# Altium PCB Zybo_Z7_Pcb.PcbDoc (part 3 of 8)
Units mm, origin at the board's own origin, x right, y up, seen from the top; angles counter-clockwise.
Board outline 122 x 88 mm, 8 copper layers (Top Layer, Layer 2, Layer 3, Layer 4, Layer 5, Layer 6, Layer 7, Bottom Layer), stack 1.625 mm thick; 658 components, 558 nets, 2538 pads, 924 vias.
Unrouted connection lines stored in the file: 1229.
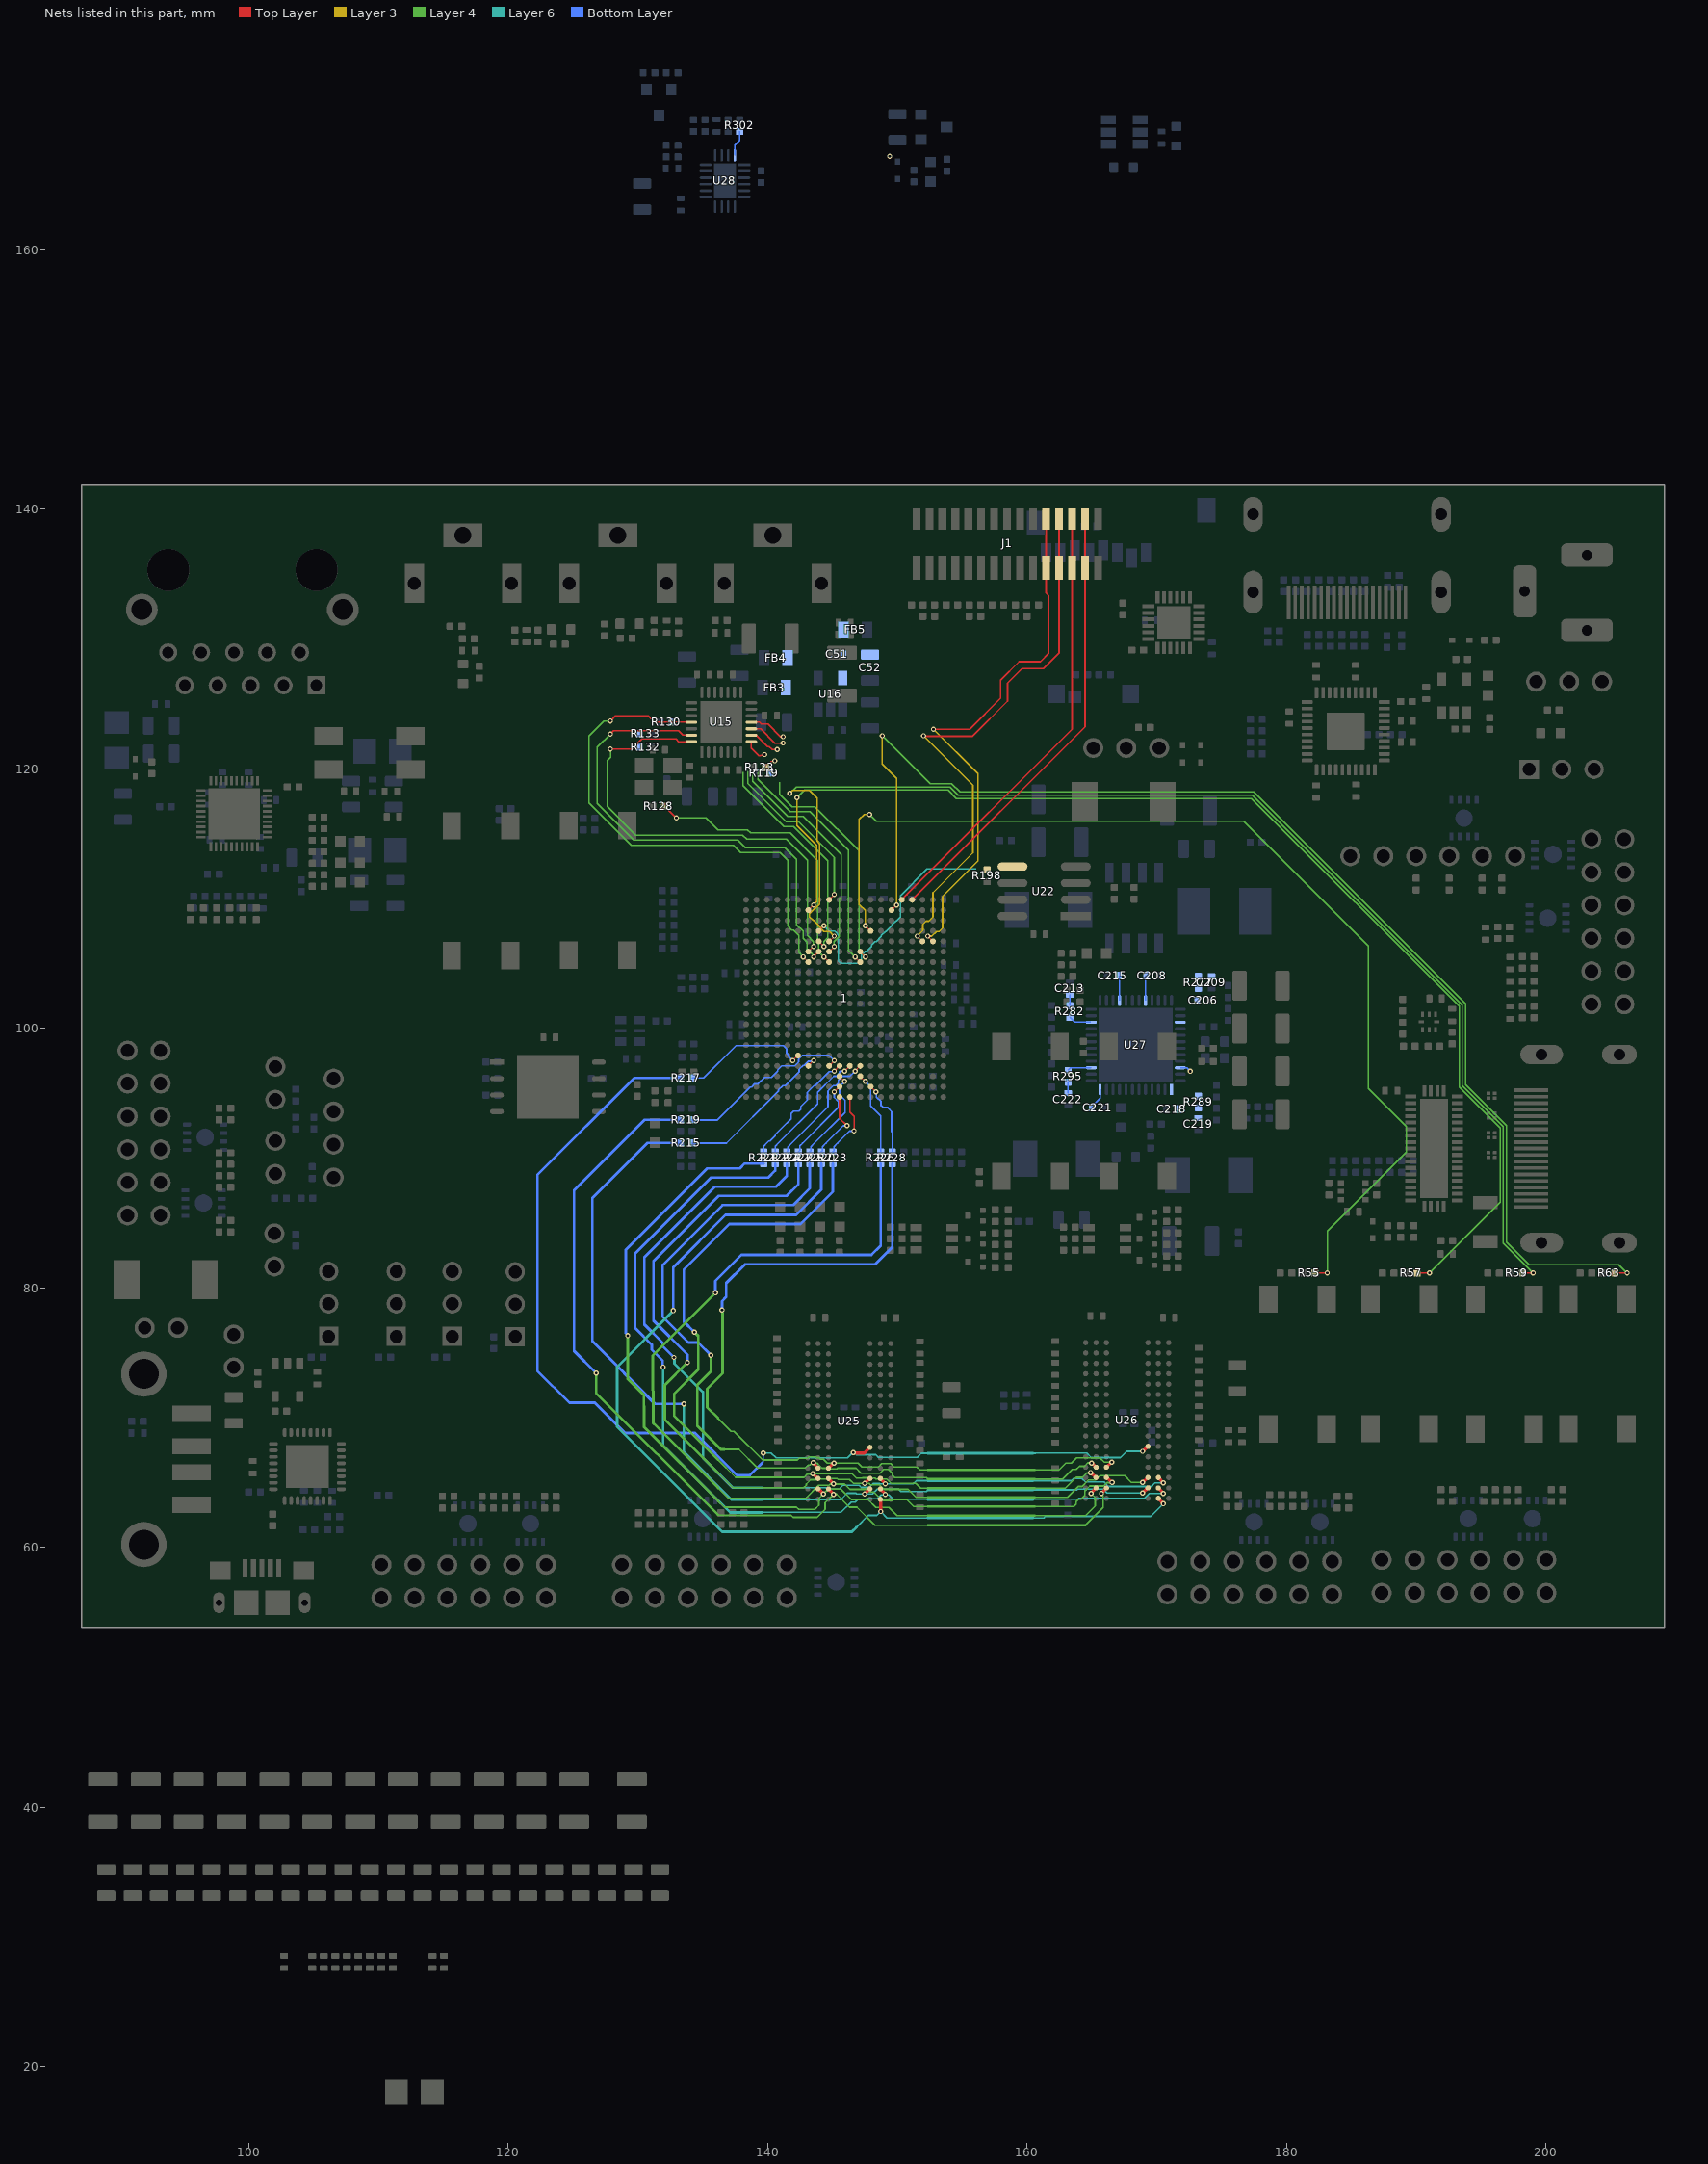
[diagram p9: the nets of this part, all layers, seen from the top]

## Footprints (in the part's own frame and the unit in brackets; to place one, negate y for a bottom-side part, rotate by r counter-clockwise, add the part's x,y. Pads: shape width x height; smd on the part's side, far side on the other; paste and mask are expansions set on the pad) (continued)
MICT-HA-96 [mm] "BGA, 96-Balls, Body 14x9mm, Pitch 0.8mm"
  round 0.4 smd: A1(-3.2,6) A2(-2.4,6) A3(-1.6,6) A7(1.6,6) A8(2.4,6) A9(3.2,6) B1(-3.2,5.2) B2(-2.4,5.2) B3(-1.6,5.2) B7(1.6,5.2) B8(2.4,5.2) B9(3.2,5.2) C1(-3.2,4.4) C2(-2.4,4.4) C3(-1.6,4.4) C7(1.6,4.4) C8(2.4,4.4) C9(3.2,4.4) D1(-3.2,3.6) D2(-2.4,3.6) D3(-1.6,3.6) D7(1.6,3.6) D8(2.4,3.6) D9(3.2,3.6) E1(-3.2,2.8) E2(-2.4,2.8) E3(-1.6,2.8) E7(1.6,2.8) E8(2.4,2.8) E9(3.2,2.8) F1(-3.2,2) F2(-2.4,2) F3(-1.6,2) F7(1.6,2) F8(2.4,2) F9(3.2,2) G1(-3.2,1.2) G2(-2.4,1.2) G3(-1.6,1.2) G7(1.6,1.2) G8(2.4,1.2) G9(3.2,1.2) H1(-3.2,0.4) H2(-2.4,0.4) H3(-1.6,0.4) H7(1.6,0.4) H8(2.4,0.4) H9(3.2,0.4) J1(-3.2,-0.4) J2(-2.4,-0.4) J3(-1.6,-0.4) J7(1.6,-0.4) J8(2.4,-0.4) J9(3.2,-0.4) K1(-3.2,-1.2) K2(-2.4,-1.2) K3(-1.6,-1.2) K7(1.6,-1.2) K8(2.4,-1.2) K9(3.2,-1.2) L1(-3.2,-2) L2(-2.4,-2) L3(-1.6,-2) L7(1.6,-2) L8(2.4,-2) L9(3.2,-2) M1(-3.2,-2.8) M2(-2.4,-2.8) M3(-1.6,-2.8) M7(1.6,-2.8) M8(2.4,-2.8) M9(3.2,-2.8) N1(-3.2,-3.6) N2(-2.4,-3.6) N3(-1.6,-3.6) N7(1.6,-3.6) N8(2.4,-3.6) N9(3.2,-3.6) P1(-3.2,-4.4) P2(-2.4,-4.4) P3(-1.6,-4.4) P7(1.6,-4.4) P8(2.4,-4.4) P9(3.2,-4.4) R1(-3.2,-5.2) R2(-2.4,-5.2) R3(-1.6,-5.2) R7(1.6,-5.2) R8(2.4,-5.2) R9(3.2,-5.2) T1(-3.2,-6) T2(-2.4,-6) T3(-1.6,-6) T7(1.6,-6) T8(2.4,-6) T9(3.2,-6)
  silkscreen extent -5.27,-7 4.5,7, body extent -4.5,-7 4.5,7, height 0.1
MOLX-473521001_V [mm] "SMD, 8-Leads, Body 15.2x14mm, Pitch 1.1mm"
  rect 0.8x1.5 smd: 1(1.94,-3.66) 2(0.84,-3.26) 3(-0.26,-3.66) 4(-1.36,-3.86) 5(-2.46,-3.66) 6(-3.56,-3.86) 7(-4.66,-3.66) 8(-5.76,-3.66)
  rect 1x0.95 smd: 9(-3.56,7.425)
  rect 1.3x1.4 smd: 10(-4.95,7.2) 11(0.75,7.2)
  rect 1.4x1.9 smd: 12(6.6,-6.95) 13(-6.55,-5.95)
  silkscreen extent -7,-7.6 7.78,7.6, body extent -7.05,-7.6 7.05,7.6, height 1.85
ONSC-SOD-523-2-502-01_V [mm] "SOD, 2-Leads, Body 1.2x0.8mm"
  rect 0.48x0.4 smd: 1(-0.66,0) 2(0.66,0)
  silkscreen extent -0.75,-0.4 0.07,0.65, body extent -0.6,-0.4 0.6,0.4, height 0.7
QFN40P500X500X90-41N-D [mm]
  rect 0.7x0.2 smd: 1(-2.55,1.8) 2(-2.55,1.4) 3(-2.55,1) 4(-2.55,0.6) 5(-2.55,0.2) 6(-2.55,-0.2) 7(-2.55,-0.6) 8(-2.55,-1) 9(-2.55,-1.4) 10(-2.55,-1.8) 21(2.55,-1.8) 22(2.55,-1.4) 23(2.55,-1) 24(2.55,-0.6) 25(2.55,-0.2) 26(2.55,0.2) 27(2.55,0.6) 28(2.55,1) 29(2.55,1.4) 30(2.55,1.8)
  rect 0.2x0.7 smd: 11(-1.8,-2.55) 12(-1.4,-2.55) 13(-1,-2.55) 14(-0.6,-2.55) 15(-0.2,-2.55) 16(0.2,-2.55) 17(0.6,-2.55) 18(1,-2.55) 19(1.4,-2.55) 20(1.8,-2.55) 31(1.8,2.55) 32(1.4,2.55) 33(1,2.55) 34(0.6,2.55) 35(0.2,2.55) 36(-0.2,2.55) 37(-0.6,2.55) 38(-1,2.55) 39(-1.4,2.55) 40(-1.8,2.55)
  rect 3.95x3.95 smd: 41(0,0)
  silkscreen extent -3,2.3 -2.8,2.5, body extent -2.55,-2.55 2.55,2.55, height 0.9
QFN50P350X900X80-43N-D [mm]
  rect 0.85x0.3 smd: 1(-1.8,4) 2(-1.8,3.5) 3(-1.8,3) 4(-1.8,2.5) 5(-1.8,2) 6(-1.8,1.5) 7(-1.8,1) 8(-1.8,0.5) 9(-1.8,0) 10(-1.8,-0.5) 11(-1.8,-1) 12(-1.8,-1.5) 13(-1.8,-2) 14(-1.8,-2.5) 15(-1.8,-3) 16(-1.8,-3.5) 17(-1.8,-4) 22(1.8,-4) 23(1.8,-3.5) 24(1.8,-3) 25(1.8,-2.5) 26(1.8,-2) 27(1.8,-1.5) 28(1.8,-1) 29(1.8,-0.5) 30(1.8,0) 31(1.8,0.5) 32(1.8,1) 33(1.8,1.5) 34(1.8,2) 35(1.8,2.5) 36(1.8,3) 37(1.8,3.5) 38(1.8,4)
  rect 0.3x0.85 smd: 18(-0.75,-4.45) 19(-0.25,-4.45) 20(0.25,-4.45) 21(0.75,-4.45) 39(0.75,4.45) 40(0.25,4.45) 41(-0.25,4.45) 42(-0.75,4.45)
  rect 2.15x7.65 smd: 43(0,0)
  silkscreen extent -2.22,4.63 -1.97,4.87, body extent -1.75,-4.5 1.75,4.5, height 0.8
QFN50P400X400X80-25N-D [mm]
  rect 0.9x0.3 smd: 1(-1.95,1.25) 2(-1.95,0.75) 3(-1.95,0.25) 4(-1.95,-0.25) 5(-1.95,-0.75) 6(-1.95,-1.25) 13(1.95,-1.25) 14(1.95,-0.75) 15(1.95,-0.25) 16(1.95,0.25) 17(1.95,0.75) 18(1.95,1.25)
  rect 0.3x0.9 smd: 7(-1.25,-1.95) 8(-0.75,-1.95) 9(-0.25,-1.95) 10(0.25,-1.95) 11(0.75,-1.95) 12(1.25,-1.95) 19(1.25,1.95) 20(0.75,1.95) 21(0.25,1.95) 22(-0.25,1.95) 23(-0.75,1.95) 24(-1.25,1.95)
  rect 2.55x2.55 smd: 25(0,0)
  silkscreen extent -2.52,1.88 -2.28,2.12, body extent -2,-2 2,2, height 0.8
R_0402 [mm] "Chip 0402 resistor"
  rrect25% 0.55x0.55 smd: 1(-0.45,0) 2(0.45,0)
  body extent -0.49,-0.24 0.49,0.24, height 0.35
RHA0040D_V [mm] "QFN, 40-Leads, Body 6x6mm, Pitch 0.5mm, Thermal Pad 2.9x2.9mm"
  rrect36% 0.85x0.28 smd: 1(-2.975,2.25) 2(-2.975,1.75) 3(-2.975,1.25) 4(-2.975,0.75) 5(-2.975,0.25) 6(-2.975,-0.25) 7(-2.975,-0.75) 8(-2.975,-1.25) 9(-2.975,-1.75) 10(-2.975,-2.25) 21(2.975,-2.25) 22(2.975,-1.75) 23(2.975,-1.25) 24(2.975,-0.75) 25(2.975,-0.25) 26(2.975,0.25) 27(2.975,0.75) 28(2.975,1.25) 29(2.975,1.75) 30(2.975,2.25)
  rrect36% 0.28x0.85 smd: 11(-2.25,-2.975) 12(-1.75,-2.975) 13(-1.25,-2.975) 14(-0.75,-2.975) 15(-0.25,-2.975) 16(0.25,-2.975) 17(0.75,-2.975) 18(1.25,-2.975) 19(1.75,-2.975) 20(2.25,-2.975) 31(2.25,2.975) 32(1.75,2.975) 33(1.25,2.975) 34(0.75,2.975) 35(0.25,2.975) 36(-0.25,2.975) 37(-0.75,2.975) 38(-1.25,2.975) 39(-1.75,2.975) 40(-2.25,2.975)
  rrect3% 2.9x2.9 smd: 41(0,0)
  silkscreen extent -3.85,-3.08 3.08,3.08, body extent -3,-3 3,3, height 1
ROHM-SOT723-3_V [mm] "SOT723, 3-Leads, Body 1.2x0.8mm, Pitch 0.8mm"
  rrect30% 0.45x0.4 smd: 1(-0.575,0.4) 2(-0.575,-0.4)
  rrect30% 0.45x0.5 smd: 3(0.575,0)
  body extent -0.53,-0.63 0.53,0.63, height 0.45
SOIC127P600X175-8N [mm]
  rect 1.525x0.65 smd: 1(-2.712,1.905) 2(-2.712,0.635) 3(-2.712,-0.635) 4(-2.712,-1.905) 5(2.712,-1.905) 6(2.712,-0.635) 7(2.712,0.635) 8(2.712,1.905)
  silkscreen extent -3.47,-2.45 1.6,2.58, body extent -3,-2.45 3,2.45, height 1.75
SWIT-PJRAN1X1U01X_V [mm] "Jack, 3-Leads, Body 19.5x10mm"
  rect 3x1.8 hole 1.3 square paste-2539.97: 1(0,0)
  rect 1.5x3 hole 1 square paste-2539.97: 2(-3.75,3.7) 3(3.75,3.7)
  silkscreen extent -5.77,-4 5,6, body extent -5,-13.5 5,6, height 13
TCM06U_DFN65X50X35-4N [mm] "DFN, 4-Leads, Body 0.65x0.50mm, Pitch 0.45mm, IPC Medium Density"
  rrect25% 0.3x0.25 smd: 1(-0.25,0.182) 2(-0.25,-0.183) 3(0.25,-0.183) 4(0.25,0.182)
  body extent -0.38,-0.28 0.35,0.28, height 0.35
WL-SFTW_3528_150352M173303 [mm] "SMT Full-color TOP LED Waterclear, body 3.5x2.8mm"
  rect 0.89x0.55 smd: 1(-1.395,0.85) 2(1.395,0.85) 3(-1.395,0) 4(1.395,0) 5(-1.395,-0.85) 6(1.395,-0.85)
  silkscreen extent -2.47,-1.43 1.63,1.43, body extent -1.75,-1.4 1.75,1.4, height 1.78

## Part data
1: "Integrated Circuit", Manufacturer_Name=AMD, Mouser Part Number=217-XC7Z020-1CLG400C, Datasheet Link=http://www.xilinx.com/support/documentation/data_sheets/ds190-Zynq-7000-Overview.pdf, Height=1.6mm, Manufacturer_Part_Number=XC7Z020-1CLG400C, Mouser Price/Stock=https://www.mouser.co.uk/ProductDetail/AMD-Xilinx/XC7Z020-1CLG400C?qs=rrS6PyfT74eaxuOsP%2FGL4g%3D%3D
C1 C2 C8 C9 C15 C17 C23 C25 C28 C29 C33 C34 C42 C49 C52 C96 C97 C98 C104 C105 C106 C108 C117 C118 C119 C121 C127 C133 C134 C138 C139 C147 C148 C149 C150 C151 C157 C196 C199 C211 C223 C224 C226 C232: library part CMP-001-00086-2, "MLCC 0805"
C3 C4 C5 C6 C7 C11 C12 C13 C14 C16 C18 C19 C20 C21 C24 C26 C27 C30 C32 C35 C37 C38 C40 C43 C45 C46 C47 C48 C50 C51 C53 C54 C55 C56 C57 C58 C59 C60 C61 C62 C63 C64 C65 C66 C67 C68 C69 C70 C71 C72 C73 C74 C75 C78 C79 C80 C81 C82 C83 C84 C85 C86 C87 C88 C89 C90 C91 C92 C99 C100 C101 C102 C103 C109 C110 C112 C113 C114 C115 C116 C122 C123 C125 C126 C129 C130 C131 C135 C136 C137 C141 C142 C143 C144 C145 C152 C153 C154 C156 C158 C159 C160 C161 C162 C163 C164 C165 C166 C167 C168 C169 C170 C171 C172 C173 C174 C175 C176 C177 C178 C179 C180 C181 C182 C183 C184 C185 C186 C187 C188 C189 C190 C191 C192 C193 C194 C195 C197 C198 C206 C208 C209 C213 C214 C215 C218 C219 C221 C222 C227 C229 C231: library part CMP-001-00084-2, "MLCC 0402"
C31 C36 C77 C93 C94 C95 C107 C111 C120 C124 C128 C132 C140 C146 C155 C200 C201 C202 C203 C212 C216 C217 C220: library part CMP-001-00088-1, "1210, X5R:EIA, 100uF, DC6.3V, GRM32ER60J107ME20"
C39 C41 C44 C204 C205 C207 C210 C225 C228 C230: library part CMP-001-00085-2, "MLCC 0603"
C76 C233: library part CMP-04424-000170-1, "47uF 6.3V  ±20% 1.1Ω 2917  SMD Tantalum Capacitor", Capacitance=47uF, Case/Package=2917, ESR (Equivalent Series Resistance)=1.1R, Max Operating Temperature=125°C, Min Operating Temperature=-55°C, Package Quantity=500, Tolerance=20%, Voltage Rating=6.3V, Depth=4.3mm, Dissipation Factor=6%, Features="General Purpose", Height - Seated (Max)=0.122inch, Lead Free="Lead Free", Length=0.287inch, Mount="Surface Mount", Packaging="Tape and Reel", Polarity=Polar, RoHS Compliant=Yes, Series=TAJ, Voltage Rating (DC)=6.3V, Width=0.169inch
D1 D2 D12 D15 D18: library part CMP-1054-00076-1, "Switching Diode, 2-Pin SOD-523, Pb-Free, Tape and Reel", Manufacturer="On Semiconductor", ComponentLink1Description="Manufacturer URL", ComponentLink1URL=http://www.onsemi.com/, ComponentLink2Description=Datasheet, ComponentLink2URL=http://www.onsemi.com/pub_link/Collateral/BAS16XV2T1-D.PDF, ComponentLink3Description="Package Specification", ComponentLink3URL=http://www.onsemi.com/pub_link/Collateral/502-01.PDF, Configuration=Single, DatasheetVersion="Rev. 7", IF Max (A)=0.2, Mounting Technology="Surface Mount", PackageDescription="2-Pin SOD, Body 1.2 x 0.8 mm", PackageReference=SOD-523-2-502-01, PackageVersion="Rev. E, 09/2010", Packing="Tape and Reel", PartNumber=BAS16XV2T1G, RoHS=TRUE, trr Max (ns)=6
D6 D7: library part CMP-03913-162511587-1, "Led, Rgb, 625/520/470Nm, 120Deg Rohs Compliant: Yes", Forward Current=100mA, Forward Voltage=2V, Manufacturer Lifecycle Status=NEW, Max Operating Temperature=105°C, Max Reverse Voltage (DC)=5V, Min Operating Temperature=-40°C, Power Dissipation=65mW, Dominant Wavelength=520nm, Lifecycle Status=New, Luminous Intensity=500mcd, Peak Wavelength=465nm, RoHS=Compliant, Viewing Angle=120°, YEOL="1 = Estimated lifetime > 10 years"
D16: library part CMP-07162-000019-1, "DIODE SCHOTTKY 30V 200MA SOD523F", Capacitance=7pF, Forward Current=200mA, Manufacturer="ON Semiconductor", Manufacturer Part Number=BAT43XV2, Max Junction Temp=+125°C, Max Repetitive Reverse Voltage=30V, Max Surge Forward Current=4A, Package=502-01, Peak Reverse Current=0.5uA, Temperature="to +125°C", Automotive=No, Category=Diode, ComponentLink2Description=Datasheet, ComponentLink2URL=https://www.onsemi.com/pub/Collateral/BAT43XV2-D.PDF, Device Class L1="Discrete Semiconductors", Device Class L2=Diodes, Device Class L3="Schottky Diodes", Digikey Description="DIODE SCHOTTKY 30V 200MA SOD523F", Footprint Url=https://www.onsemi.com/pub/Collateral/502-01.PDF, Height=0.7mm, Lead Free=Yes, Mouser Description="Schottky Diodes & Rectifiers Schottky Barrier Diode", Octopart=https://octopart.com/bat43xv2-on+semiconductor-84324519, Reverse Voltage=30V, RoHS=TRUE, Temperature Range High=+125°C
DS1 DS2 DS3 DS4 DS5 DS6 DS7 DS8 DS9 DS10 DS11: library part CMP-007-00005-2, "Chip LED, Yellow, 5 V, 25mA, -40 to 85 degC, 2-Pin SMD (0603), RoHS, Tape and Reel", Case/Package=0603, Manufacturer="Everlight Electronics", Package Description="2-Pin Surface Mount Device, Body 1.6 x 0.8 mm", Datasheet URL=http://www.fairchip.com/pdf/Everlight/19-217-Y5C-AM1N1VY-3T.pdf, Datasheet Version="Rev. 1.0, 12/2005", Manufacturer URL=http://www.everlight.com/, Mounting Technology=SM, Package Reference=0603, RoHS Compliant=False
F1: library part CMP-16043-000007-1, "PTC RESET FUSE 30V 200MA 1206", Case Code (Imperial)=1206, Case Code (Metric)=3216, Hold Current=200mA, Max Current Rating=10A, Max Operating Temperature=85°C, Max Voltage Rating (DC)=30V, Min Operating Temperature=-40°C, Package Quantity=3000, Power Dissipation=400mW, Trip Current=400mA, Approvals=UL, Case/Package=1206, Contact Plating=Tin, Lead Free="Lead Free", Mount="Surface Mount", Number of Terminals=2, Packaging="Cut Tape", Time to Trip=0.1s
FB1 FB2 FB7 FB8: library part CMP-06046-002432-1, "Chip Ferrite Bead, 1206, 600Ω @ 100MHz, 0.038Ω, 25%, 2.9A", Case Code (Imperial)=1206, Case Code (Metric)=3216, DC Resistance (DCR)=38mR, Max Current Rating=2.9A, Max Operating Temperature=125°C, Min Operating Temperature=-55°C, Case/Package=1206, Mount="Surface Mount", Number of Lines=1, Packaging="Cut Tape"
FB3 FB4 FB5 FB6: library part CMP-2000-05401-2, Case Code (Imperial)=0805, Case Code (Metric)=2012, Current Rating=2A, DC Resistance (DCR)=100mΩ, Manufacturer Lifecycle Status=PRODUCTION, Max Operating Temperature=125°C, Min Operating Temperature=-55°C, Test Frequency=100MHz, Tolerance=25%, Case/Package=0805, Core Material=Ferrite, Height=1.0414mm, Impedance=600Ω, Lead Free="Lead Free", Length=2mm, Lifecycle Status=Production, Max DC Current=2A, Max Length=2.2mm, Max Width=1.45mm, Min Length=1.8mm, Min Width=1.05mm, Mount="Surface Mount", NexarPartId=12090955, Packaging=Digi-Reel®, REACH SVHC="No SVHC", Resistance=100mΩ, RMS Current (Irms)=2A, RoHS=Compliant, Schedule B="8504500000, 8504500000", Series Resistance=100mΩ, Width=1.25mm
IC1: "Integrated Circuit", Manufacturer_Name=Realtek, Height=0.9mm, Manufacturer_Part_Number=RTL8211F-CG
IC2: "Integrated Circuit", Manufacturer_Name="Texas Instruments", Mouser Part Number=595-TXS02612RTWR, Arrow Part Number=TXS02612RTWR, Arrow Price/Stock=https://www.arrow.com/en/products/txs02612rtwr/texas-instruments?utm_currency=USD&region=nac, Datasheet Link=http://www.ti.com/lit/gpn/txs02612, Height=0.8mm, Manufacturer_Part_Number=TXS02612RTWR, Mouser Price/Stock=https://www.mouser.co.uk/ProductDetail/Texas-Instruments/TXS02612RTWR?qs=dqESbKqT1jaNFKC1R4M7hw%3D%3D
IC3: "Integrated Circuit", Manufacturer_Name="Texas Instruments", Mouser Part Number=595-TS3DV642A0RUAR, Arrow Part Number=TS3DV642A0RUAR, Arrow Price/Stock=https://www.arrow.com/en/products/ts3dv642a0ruar/texas-instruments.html?utm_currency=USD&region=nac, Datasheet Link=http://www.ti.com/lit/gpn/ts3dv642, Height=0.8mm, Manufacturer_Part_Number=TS3DV642A0RUAR, Mouser Price/Stock=https://www.mouser.co.uk/ProductDetail/Texas-Instruments/TS3DV642A0RUAR?qs=zjX5mX%252BjEMCTQjtLUY3z%2FA%3D%3D
IC4: "Integrated Circuit", Manufacturer_Name=NXP, Mouser Part Number=771-GTL2002GM125, Datasheet Link=https://componentsearchengine.com/Datasheets/2/GTL2002GM,125.pdf, Height=0.5mm, Manufacturer_Part_Number=GTL2002GM,125, Mouser Price/Stock=https://www.mouser.co.uk/ProductDetail/NXP-Semiconductors/GTL2002GM125?qs=me8TqzrmIYUIuvCVdWJDlA%3D%3D
IC5: "Integrated Circuit", Manufacturer_Name=onsemi, Mouser Part Number=512-FDS9926A, Arrow Part Number=FDS9926A, Arrow Price/Stock=https://www.arrow.com/en/products/fds9926a/on-semiconductor?utm_currency=USD&region=nac, Datasheet Link=https://www.onsemi.com/pub/Collateral/FDS9926A-D.PDF, Height=1.75mm, Manufacturer_Part_Number=FDS9926A, Mouser Price/Stock=https://www.mouser.co.uk/ProductDetail/onsemi-Fairchild/FDS9926A?qs=HK%252BeIG1iaagpgrEVRWCDdA%3D%3D
J1: library part CMP-03368-000001-1, "CONN FPC VERT 15POS 1.00MM SMD", Current Rating=1A, Manufacturer=TE, Package=0, Temperature="-20°C to +85°C", Temperature Range High=+85°C, Temperature Range Low=-20°C, Voltage Rating=125V, Automotive=No, Category=Conn, ComponentLink2Description=Datasheet, ComponentLink2URL=https://www.te.com/commerce/DocumentDelivery/DDEController?Action=showdoc&DocId=Customer+Drawing%7F1734248%7FE1%7Fpdf%7FEnglish%7FENG_CD_1734248_E1__.pdf%7F1-1734248-5, Conn Gender=Female, Conn Orientation=Vertical, Contact Material=Gold,Nickel, Device Class L1=Connectors, Device Class L2="FFC / FPC", Device Class L3=unset, Digikey Description="CONN FPC VERT 15POS 1.00MM SMD", Height=8mm, Is Female=yes, Lead Free=Yes, Manufacturer Part Number=1-1734248-5, Mounting Type="Surface Mount", Mouser Description="FFC & FPC Connectors 15P 1.0 FPC, Zip V/T SMT", Number Of Contacts=15, Octopart=https://octopart.com/1-1734248-5-te+connectivity-40620898, Pitch=1mm, RoHS=TRUE
J2: library part CMP-218039-000001-2, "Conn RJ-45 F 8 POS 2.54mm Solder RA Thru-Hole 10 Terminal 1 Port", Manufacturer=HALO, Package=0, Temperature="0°C to +70°C", Temperature Range High=+70°C, Temperature Range Low=0°C, Automotive=No, Category=Conn, ComponentLink2Description=Datasheet, ComponentLink2URL=https://www.haloelectronics.com/pdf/fastjack-gigabit.pdf, Conn Gender=Female, Conn Orientation=Horizontal, Contact Material=Gold, Device Class L1=Connectors, Device Class L2="Modular / Ethernet Connectors", Device Class L3=unset, Height=0.624inch, Is Female=yes, Lead Free=Yes, Manufacturer Part Number=HFJ11-1G01ERL, Mouser Description="Conn RJ-45 F 8 POS 2.54mm Solder RA Thru-Hole 10 Terminal 1 Port", Number Of Contacts=8, Octopart=https://octopart.com/hfj11-1g01erl-halo-4052130, Pitch=1.27mm, RoHS=TRUE, Shielding=true
J3 J4 J5: library part CMP-1772-00003-1, "Female Phono Jack, 3 Position, Height 13 mm, Tail Length 4 mm, RoHS, Bulk", Capacitance="100 nF", Case\Package=Radial, Max Operating Temperature="125 degC", Min Operating Temperature="-55 degC", Package Quantity=500, Tolerance=10%, Type (Capacitors)=X7R, Voltage Rating="50 V", ComponentLink1Description="Manufacturer URL", ComponentLink1URL=http://www.switchcraft.com/, ComponentLink2Description=Datasheet, ComponentLink2URL=http://www.conxall.com/Drawings/pjran1x1u__x_series_cd.pdf, DatasheetVersion="Rev. A, 01/2006", Height="3.18 mm", Lead Pitch="2.54 mm", Length="6.6 mm", Mount="Through Hole", PackageDescription="Female Phono Jack, 3 Position, Height 13 mm, Tail Length 4 mm", PackageReference=PJRAN1X1U01X, Packaging=Bulk, Pins=2, Radiation Hardening=No, REACH SVHC="No SVHC", RoHSCompliant=true, Voltage Rating (DC)="50 V", Width="5.08 mm"
J6 J7: library part CMP-1502-00169-4, "HDMI Receptacle Connector 19 Position Surface Mount, Right Angle Through Hole", Color=Black, Contact Resistance=30mΩ, Current Rating=500mA, Insulation Resistance=10MΩ, Max Operating Temperature=85°C, Min Operating Temperature=-25°C, Voltage Rating=40V, Body Material=Plastic, Connector Type=HDMI, Contact Material=Gold, Features=Shielded, Gender=Receptacle, Height=6.28mm, Length=12.15mm, Mount="Horizontal, Surface Mount", Number Of Contacts=19, Number of Pins=19, Number of Positions=19, Orientation=Horizontal, Packaging="Tape and Reel", REACH SVHC=Unknown, RoHS=Compliant, Termination=SMD/SMT, Width=15mm
J8: library part CMP-2000-05119-1, "Micro USB B Type Receptacle, -55 to 85 degC, 5-Pin SMD, RoHS, Tape and Reel", Color=Black, Current Rating=1.8A, Flammability Rating=UL94V-0, Insulation Resistance=1000MOhms, Manufacturer=FCI, Operating Temperature Range=-55Cto+85C, Brand=FCI, Connector Type=MicroUSBTypeBreceptacle, Contact Material=CopperAlloy, Contact Plating=Gold, Datasheet URL=http://datasheet.octopart.com/10118193-0001LF-FCI-datasheet-55953155.pdf, Datasheet Version="Rev. C, 05/2015", Factory Pack Quantity=1200, Gender=Female, Manufacturer URL=http://www.fci.com/, Mounting Angle=Right, Number Of Contacts=5Contact, Packaging=Reel, Product=MicroUSBTypeBConnectors, Product Category=USBConnectors, RoHS=Details, Standard=USB2.0, Termination Style=SMD/SMT
J9: library part CMP-03360-000008-1, "CONN RCPT USB2.0 TYPEA 4P SMD RA", Current Rating=1A, Manufacturer="TE Connectivity", Temperature="-55°C to +85°C", Temperature Range High=+85°C, Temperature Range Low=-55°C, Voltage Rating=30V, Automotive=No, Category=Conn, ComponentLink2Description=Datasheet, ComponentLink2URL=https://www.te.com/usa-en/product-292303-7.html?te_bu=Cor&te_type=other&te_campaign=oct_glo_cor-oct-global-oth-prtnr-fy19-oct-octo-buy-bom_sma-298_2&elqCampaignId=35216, Conn Orientation="Right Angle", Contact Material=Gold,Nickel, Device Class L1=Connectors, Device Class L2="USB Connectors", Device Class L3=unset, Digikey Description="CONN RCPT USB2.0 TYPEA 4P SMD RA", Is Female=yes, Lead Free=Yes, Manufacturer Part Number=292303-7, Mouser Description="USB Connectors USB A R/A Recpt Assy SMT", Number Of Contacts=4, Octopart=https://octopart.com/292303-7-te+connectivity-42840369, Package=292303-7, RoHS=TRUE, Shielding=true, Usb Standard="USB 2.0"
J10: library part CMP-1502-00190-4, "DC Power Jack Connector WR-DC, Male, Right Angled, THT, 5 A, 24 V", Color=Black, Current Rating=5A, Flammability Rating="UL94 V-0", Insulation Resistance=100MΩ, Max Operating Temperature=85°C, Min Operating Temperature=-40°C, Operating Supply Voltage=24V, Voltage Rating=30V, Connector Type=Power, Contact Gender=Female, Contact Material="Gold, Tin", Contact Plating=Tin, Gender=Male, Height=11mm, Housing Material=Polyamide, Mount="Through Hole", Number Of Contacts=3, Packaging=Bulk, REACH SVHC=Unknown, RoHS=Compliant, Shielding=Unshielded, Termination="Through Hole"
L1 L2 L3 L4: library part CMP-006-00021-1, "Common mode filters Ultra high-speed differential signal line TCM-U series"
L6: library part ETQ-P3M3R3YFP, "Inductor", Manufacturer_Name=Panasonic, Mouser Part Number=667-ETQ-P3M3R3YFP, Arrow Part Number=ETQ-P3M3R3YFP, Arrow Price/Stock=https://www.arrow.com/en/products/etq-p3m3r3yfp/panasonic.html?utm_currency=USD&region=nac, Datasheet Link=https://industrial.panasonic.com/cdbs/www-data/pdf/AGL0000/AGL0000C59.pdf, Height=4mm, Manufacturer_Part_Number=ETQ-P3M3R3YFP, Mouser Price/Stock=https://www.mouser.co.uk/ProductDetail/Panasonic/ETQ-P3M3R3YFP?qs=sL7MMaRBAPWa%252BM34GljCkQ%3D%3D
L7 L8 L9: library part CMP-02424-000709-1, "Fixed Inductors Commercial High Saturation Series 1.5uH 7.2A 20.7mΩ 20%", Case/Package=2020, Current Rating=7.2A, DC Resistance (DCR)=20.7mR, Inductance=1.5uH, Inductance Tolerance=20%, Max DC Current=11A, Max Operating Temperature=125°C, Min Operating Temperature=-55°C, Package Quantity=2000, Self Resonant Frequency=5MHz, Test Frequency=100kHz, Core Material=Metal, Depth=5.43mm, Height=3mm, Height - Seated (Max)=0.118inch, Lead Free="Lead Free", Length=5.49mm, Military Standard=Not, Mount="Surface Mount", Packaging="Tape and Reel", Radiation Hardening=No, RMS Current (Irms)=7.2A, RoHS Compliant=Yes, Saturation Current=11A, Series=IHLP-2020CZ-01, Shielding=Shielded, Termination=SMD/SMT, Tolerance=20%, Width=5.18mm
P1 P2 P3 P4 P5 P6: library part CMP-002-00077-1, "Male Header, Pitch 2.54 mm, 2x6 Position, Height 8.636 mm, Tail Length 3.05 mm, -55 to 105 degC, RoHS, Bulk", Case/Package=2340-6111TG, Colour=Black, Current Rating=3A, Manufacturer=3M, Max Operating Temperature=105°C, Min Operating Temperature=-55°C, Package Description="Male Header, Pitch 2.54 mm, 1 x 40 Position, Height 8.636 mm, Tail Length 3.05 mm", Package Quantity=200, Connector Type=Header, Contact Finish=Gold, Contact Material=Copper, Contact Plating=Gold, Datasheet URL=https://datasheet.ciiva.com/5161/ts0766-242217-5161112.pdf, Datasheet Version=Aug-08, Gender=Male, Lead Pitch=0.1inch, Manufacturer URL=http://www.3m.com/, Max Current Rating=3A, Mounting Technology=TH, Package Reference=2340-6111TG, Packaging=Bulk, Pins=40, RoHS Compliant=True, Rows=1
P7 P8 P11 P13 P14: library part CMP-002-00078-1, "Male Header, Pitch 2.54 mm, 2x 1 Position, Height 8.636 mm, Tail Length 3.05 mm, -55 to 105 degC, RoHS, Bulk", Case/Package=2340-6111TG, Colour=Black, Current Rating=3A, Manufacturer=3M, Max Operating Temperature=105°C, Min Operating Temperature=-55°C, Package Description="Male Header, Pitch 2.54 mm, 1 x 40 Position, Height 8.636 mm, Tail Length 3.05 mm", Package Quantity=200, Connector Type=Header, Contact Finish=Gold, Contact Material=Copper, Contact Plating=Gold, Datasheet URL=https://datasheet.ciiva.com/5161/ts0766-242217-5161112.pdf, Datasheet Version=Aug-08, Gender=Male, Lead Pitch=0.1inch, Manufacturer URL=http://www.3m.com/, Max Current Rating=3A, Mounting Technology=TH, Package Reference=2340-6111TG, Packaging=Bulk, Pins=40, RoHS Compliant=True, Rows=1
P9: library part CMP-002-00079-1, "Male Header, Pitch 2.54 mm, 1x6 Position, Height 8.636 mm, Tail Length 3.05 mm, -55 to 105 degC, RoHS, Bulk", Case/Package=2340-6111TG, Colour=Black, Current Rating=3A, Manufacturer=3M, Max Operating Temperature=105°C, Min Operating Temperature=-55°C, Package Description="Male Header, Pitch 2.54 mm, 1 x 40 Position, Height 8.636 mm, Tail Length 3.05 mm", Package Quantity=200, Connector Type=Header, Contact Finish=Gold, Contact Material=Copper, Contact Plating=Gold, Datasheet URL=https://datasheet.ciiva.com/5161/ts0766-242217-5161112.pdf, Datasheet Version=Aug-08, Gender=Male, Lead Pitch=0.1inch, Manufacturer URL=http://www.3m.com/, Max Current Rating=3A, Mounting Technology=TH, Package Reference=2340-6111TG, Packaging=Bulk, Pins=40, RoHS Compliant=True, Rows=1
P10 P15: library part CMP-002-00080-1, "Male Header, Pitch 2.54 mm, 1x3 Position, Height 8.636 mm, Tail Length 3.05 mm, -55 to 105 degC, RoHS, Bulk", Case/Package=2340-6111TG, Colour=Black, Current Rating=3A, Manufacturer=3M, Max Operating Temperature=105°C, Min Operating Temperature=-55°C, Package Description="Male Header, Pitch 2.54 mm, 1 x 40 Position, Height 8.636 mm, Tail Length 3.05 mm", Package Quantity=200, Connector Type=Header, Contact Finish=Gold, Contact Material=Copper, Contact Plating=Gold, Datasheet URL=https://datasheet.ciiva.com/5161/ts0766-242217-5161112.pdf, Datasheet Version=Aug-08, Gender=Male, Lead Pitch=0.1inch, Manufacturer URL=http://www.3m.com/, Max Current Rating=3A, Mounting Technology=TH, Package Reference=2340-6111TG, Packaging=Bulk, Pins=40, RoHS Compliant=True, Rows=1
P12: library part CMP-002-00081-1, "Male Header, Pitch 2.54 mm, 1x4 Position, Height 8.636 mm, Tail Length 3.05 mm, -55 to 105 degC, RoHS, Bulk", Case/Package=2340-6111TG, Colour=Black, Current Rating=3A, Manufacturer=3M, Max Operating Temperature=105°C, Min Operating Temperature=-55°C, Package Description="Male Header, Pitch 2.54 mm, 1 x 40 Position, Height 8.636 mm, Tail Length 3.05 mm", Package Quantity=200, Connector Type=Header, Contact Finish=Gold, Contact Material=Copper, Contact Plating=Gold, Datasheet URL=https://datasheet.ciiva.com/5161/ts0766-242217-5161112.pdf, Datasheet Version=Aug-08, Gender=Male, Lead Pitch=0.1inch, Manufacturer URL=http://www.3m.com/, Max Current Rating=3A, Mounting Technology=TH, Package Reference=2340-6111TG, Packaging=Bulk, Pins=40, RoHS Compliant=True, Rows=1
Q1 Q2 Q3 Q4 Q5 Q6: library part CMP-013-00028-2, "NPN General Purpose Transistor, 3-Pin SOT-723, Pb-Free, Tape and Reel", Case/Package=SOT-723, ComponentLink1Description="Manufacturer URL", ComponentLink1URL=http://www.onsemi.com/, ComponentLink2Description=Datasheet, ComponentLink2URL=http://www.onsemi.cn/pub_link/Collateral/MMBT2222AM3-D.PDF, ComponentLink3Description="Package Specification", ComponentLink3URL=http://www.onsemi.com/pub_link/Collateral/631AA.PDF, Mounting Technology=SMT, Pins=3, RoHS Compliant=TRUE
Q7 Q8: library part CMP-2000-04935-2, "MOSFET N-CH 25V 220MA SOT-23", Continuous Drain Current=0.22A, Drain To Source Breakdown Voltage=25V, Drain To Source Resistance=3.1Ω, Gate To Source Voltage=8V, Input Capacitace At Vds="9.5pF @ 10V", Manufacturer="ON Semiconductor", Max Forward Diode Voltage=1.2V, Max Junction Temp=+150°C, Package=318-08, Power Dissipation=0.35W, Temperature="-55°C to +150°C", Temperature Range Low=-55°C, Typ Forward Diode Voltage=0.8V, Automotive=No, Category=Trans, ComponentLink2Description=Datasheet, ComponentLink2URL=https://www.onsemi.com/pub/Collateral/FDV301N-D.PDF, Depletion Mode=False, Device Class L1="Discrete Semiconductors", Device Class L2=Transistors, Device Class L3=MOSFETs, Digikey Description="MOSFET N-CH 25V 220MA SOT-23", Drain To Source Voltage=25V, Footprint Url=https://www.onsemi.com/pub/Collateral/318-08.PDF, Gate Charge At Vgs="0.49nC @ 4.5V", Height=1.11mm, Ipc Land Pattern Name=SOT95P240X100-3, Lead Free=Yes, Manufacturer Part Number=FDV301N, Mouser Description="MOSFET N-Ch Digital", Number Of Channels=1, Number Of N Channels=1, Octopart=https://octopart.com/fdv301n-on+semiconductor-84326713, RoHS=TRUE, Rthja Max=357°C/W, Standoff Height=0.01mm, Temperature Range High=+150°C, Threshold Vgs Max=1.06V, Threshold Vgs Min=0.7V, Transconductance=0.2S, Turn Off Delay Time=3.5ns, Turn On Delay Time=3.2ns
R1 R2 R3 R4 R5 R6 R7 R8 R9 R10 R11 R12 R13 R14 R15 R16 R17 R18 R19 R20 R21 R22 R23 R24 R25 R26 R27 R28 R29 R30 R31 R32 R33 R34 R35 R36 R37 R38 R39 R40 R41 R42 R43 R44 R45 R46 R47 R48 R49 R50 R51 R52 R53 R54 R55 R56 R57 R58 R59 R60 R61 R62 R63 R64 R65 R66 R67 R68 R69 R70 R71 R72 R73 R74 R75 R76 R77 R78 R79 R80 R81 R82 R83 R84 R85 R86 R87 R88 R89 R90 R91 R93 R94 R95 R96 R97 R98 R99 R100 R101 R102 R103 R104 R105 R106 R107 R108 R109 R110 R111 R112 R113 R114 R115 R116 R117 R118 R119 R120 R121 R122 R123 R124 R125 R126 R127 R128 R129 R130 R131 R132 R133 R134 R135 R136 R137 R138 R139 R140 R141 R142 R143 R144 R145 R146 R147 R148 R149 R150 R151 R152 R153 R154 R155 R156 R157 R158 R159 R160 R161 R162 R163 R164 R165 R166 R167 R168 R169 R170 R171 R172 R173 R174 R175 R176 R177 R178 R179 R180 R181 R182 R183 R184 R185 R186 R187 R188 R189 R190 R191 R192 R193 R194 R195 R196 R197 R198 R199 R200 R201 R202 R203 R204 R205 R206 R207 R208 R209 R210 R211 R212 R213 R214 R215 R216 R217 R218 R219 R220 R221 R222 R223 R224 R225 R226 R227 R228 R229 R230 R231 R232 R233 R234 R235 R236 R237 R238 R239 R240 R241 R242 R243 R244 R245 R246 R247 R248 R249 R250 R251 R252 R253 R254 R255 R256 R257 R258 R259 R260 R261 R262 R263 R264 R265 R266 R267 R268 R269 R270 R271 R272 R273 R274 R275 R276 R277 R278 R279 R280 R281 R282 R283 R284 R285 R286 R287 R288 R289 R290 R291 R292 R293 R294 R295 R296 R297 R298 R299 R300 R301 R302 R303 R304 R305 R306 R307 R308 R309: library part CMP-009-00178-3, "Chip 0402 resistor"
SD1: library part CMP-2000-05848-1, "MicroSD(TM), Pitch 1.1 mm, 8 Position, Height 1.88 mm, -20 to 85 degC, RoHS, Tape and Reel", Manufacturer=Molex, Package Description="MicroSD(TM), Pitch 1.1 mm, 8 Position, Height 1.88 mm", Datasheet URL=http://www.molex.com/pdm_docs/sd/473521001_sd.pdf, Datasheet Version="Rev. G, 01/2012", Manufacturer URL=http://www.molex.com/, Mounting Technology=SurfaceMount, Package Reference=473521001
SW1 SW2 SW4 SW5 SW7 SW9 SW11 SW12: library part CMP-00030-00001-1, "Switch Tactile N.O. SPST Round Button Gull Wing 0.05A 12VDC >100000Cycles 1.6N SMD T/R", Case/Package=SMD/SMT, Max Operating Temperature=70°C, Min Operating Temperature=-20°C, Mounting Technology="Surface Mount"
SW3 SW6 SW8 SW10 SW13: library part CMP-011-00006-2, "Slide Switch, SPDT, 500 V, -20 to 70 degC, 3-Pin THD, RoHS, Bulk", Contact Current Rating=200mA, Manufacturer=E-Switch, Max Operating Temperature=70°C, Min Operating Temperature=-20°C, Operating Force=250gf, Package Description="3-Pin Through Hole Device, Body 11.6 x 4 mm, Pitch 2.5 mm", Package Quantity=1000, Voltage Rating (AC)=30V, Case/Package=EG1218, Contact Finish=Silver, Contact Material=Copper, Contact Plating=Silver, Current Rating=200mA, Datasheet URL=https://www.e-switch.com/system/asset/product_line/data_sheet/119/EG.pdf, Datasheet Version=Oct-15, Manufacturer URL=http://www.e-switch.ch/en/, Mounting Technology=TH, Package Reference=EG1218, Packaging=Bulk, Pins=3, RoHS Compliant=True, Throw Configuration=SPDT, Voltage Rating (DC)=30V
U1 U2 U3 U4 U5 U6 U7 U8 U9 U10 U11 U12 U23: library part CMP-031-00006-4, "7-V bidirectional flat-clamp surge protection device 8-SON -40 to 125", Max Operating Temperature=125°C, Min Operating Temperature=-40°C, Pins=8
U15: library part CMP-020-00026-1, "Tape & Reel (TR) EAR99 Active Matte Tin (Sn) codec 90dB 1.5V 5mm 96ksps", Case/Package="LFCSP EP", Max Operating Temperature=85°C, Max Supply Voltage=3.6V, Min Operating Temperature=-40°C, Min Supply Voltage=1.5V, Interface=SPI, Mounting Technology="Surface Mount", Pins=28
U16: library part CMP-0786-00394-1, "Ultralow Noise, 150 mA CMOS Linear Regulator, 2.2 to 5.5 V Vin, 3.3 V Vout, Industrial, 5-pin SOT23 (UJ-5), Reel", Manufacturer="Analog Devices", Preset Vout Values (V)=3.3, Supply Current IGND @ Small Load=10uA, Code_JEDEC=MO-193-AB, ComponentLink1Description="Manufacturer URL", ComponentLink1URL=http://www.analog.com/en/index.html, ComponentLink2Description=Datasheet, ComponentLink2URL=http://www.analog.com/static/imported-files/data_sheets/ADP150.pdf, ComponentLink3Description="Package Specification", ComponentLink3URL=http:/www.analog.com/static/imported-files/packages/PKG_PDF/TSOT(UJ)/UJ_5.pdf, ComponentLink4Description="URL Link1", ComponentLink4URL="Product URL:http://www.analog.com/en/ADP150/productSearch.html", DatasheetVersion="Rev. A", Iout max=150mA, Mounting Technology="Surface Mount", PackageDescription="5-Pin Thin Small Outline Transistor Package, Body 2.9 x 1.6 mm, Pitch 0.95 mm", PackageReference=UJ-5, PackageVersion="100708-A, 10/2008", Packing=Reel, PartNumber=ADP150AUJZ-3.3-R7, Vin (max) (V)=5.5, Vin (min) (V)=2.2
U17: library part CMP-2000-06822-2, "IC BUF NON-INVERT 5.5V SC70-6", Case/Package=SC, High Level Output Current=32mA, Max Operating Temperature=85°C, Max Power Dissipation=180mW, Max Supply Current=24mA, Max Supply Voltage=5.5V, Min Operating Temperature=-40°C, Min Supply Voltage=1.65V, Package Quantity=1, Quiescent Current=1uA, Height=1mm, Lead Free="Lead Free", Length=2mm, Logic Function=Buffer, Low Level Output Current=32mA, Mount="Surface Mount", Number of Bits=2, Number of Bits per Element=1, Number Of Channels=2, Number of Circuits=2, Number of Elements=2, Number of Input Lines=2, Number of Inputs=2, Number of Output Lines=2, Number of Outputs=2, Number of Pins=6, Packaging="Tape and Reel", Polarity=Non-Inverting, Propagation Delay=12.6ns, Radiation Hardening=No, REACH SVHC="No SVHC", Termination=SMD/SMT, Turn-On Delay Time=11.5ns, Weight=0.028g, Width=1.25mm
U18: library part CMP-2000-06816-1, "TinyLogic UHS Buffer with Three-State Output, 1.65 to 5.5 V, -40 to 85 degC, 5-Pin SOT23, RoHS, Tape and Reel", Manufacturer="Fairchild Semiconductor", Max Processing Temp=260, Maximum High Level Output Current=-32mA, Maximum Low Level Output Current=32mA, Maximum Operating Supply Voltage=5.5V, Maximum Quiescent Current=2uA, Minimum Operating Supply Voltage=1.65V, Operating Temperature=-40to85C, Package Description="5-Pin Small Outline Transistor, Body 2.9 x 1.6 mm, Pitch 0.95 mm", Package Reference=SOT23-5, Package Version=08/2015, Tolerant I/Os=5V, Typical Operating Supply Voltage=1.8, Bus Hold=No, Datasheet URL=https://www.fairchildsemi.com/datasheets/NC/NC7SZ125.pdf, Datasheet Version="Rev. 1.0.5, 01/2014", Fabrication Technology=CMOS, Input Signal Type=Single-Ended, Lead Finish=MatteTin, Logic Function=Buffer/LineDriver, Manufacturer URL=https://www.fairchildsemi.com/, Maximum Propagation Delay Time @ Maximum CL=5.7@3.3V, Mounting=SurfaceMount, Mounting Technology=SurfaceMount, Number of Channels per Chip=1, Number of Elements per Chip=1, Number of Inputs per Chip=1, Number of Output Enables per Chip=1Low, Number of Outputs per Chip=1, Output Type=3-State, Package URL=https://www.fairchildsemi.com/package-drawings/MA/MA05B.pdf, Polarity=Non-Inverting, Propagation Delay Test Condition=50pF
U19: library part CMP-020-00027-1, "2.25-Gbps HDMI 1.3a TMDS redriver 40-VQFN 0 to 70", Case/Package=VQFN, Max Operating Temperature=70°C, Max Supply Voltage=3.6V, Min Operating Temperature=0°C, Min Supply Voltage=3V, Pins=40
U20: library part CMP-020-00028-1, "Microchip USB3320C-EZK; USB Transceiver; USB 2.0 at 480Mbit/s; 32-Pin QFN", Frequency=60MHz, Max Operating Temperature=85°C, Max Supply Voltage=2V, Min Operating Temperature=-40°C, Min Supply Voltage=1.6V, Mounting Technology="Surface Mount", Pins=32
U21: library part CMP-2000-07277-1, "Current-Limited, Power-Distribution Switch, 2.7 to 5.5 V, -40 to 85 degC, 5-Pin SOT-23 (DBV), Green (RoHS & no Sb/Br), Tape and Reel", Current Limit=1A, Manufacturer=TexasInstruments, Maximum Operating Temperature=+85C, Minimum Operating Temperature=-40C, On Resistance - Max=70mOhms, Operating Supply Voltage=2.7Vto5.5V, Output Current=500mA, Package / Case=SOT-23-5, Package Description="5-Pin Small Outline Transistor, Body 2.9 x 1.6 mm, Pitch 0.95 mm", Package Reference=DBV5, Package Version="4073253-4/N, 12/2014", Supply Voltage - Max=5.5V, Supply Voltage - Min=2.7V, Brand=TexasInstruments, Datasheet URL=http://www.ti.com/general/docs/lit/getliterature.tsp?genericPartNumber=TPS2051B&fileType=pdf, Datasheet Version="Rev. L, 06/2011", Development Kit=TPS2051BEVM, Factory Pack Quantity=3000, Manufacturer URL=http://www.ti.com/, Mounting Style=SMD/SMT, Mounting Technology=SurfaceMount, Number of Outputs=1Output, Package URL=http://www.ti.com/lit/ml/mpds018l/mpds018l.pdf, Packaging=Reel, Product=USBCurrentLimitedPowerSwitches, Product Category=PowerSwitchICs-PowerDistribution, RoHS=Details, Series=TPS2051B, Type=HighSide
U22: library part CMP-06313-000167-1, "IC AUTHENTICATION CHIP 8SOIC", Case/Package=SOIC, Max Frequency=1MHz, Max Operating Temperature=85°C, Max Supply Voltage=5.5V, Min Operating Temperature=-40°C, Min Supply Voltage=2V, Output Current=4mA, Output Voltage=400mV, Package Quantity=1, Access Time=550ns, Contact Plating=Gold, Density=4.5Kb, Interface=Serial, Lead Free="Lead Free", Mount="Surface Mount", Number of Input Lines=1, Number of Output Lines=1, Number of Pins=8, Packaging="Cut Tape", RoHS Compliant=Yes, Series=CryptoAuthentication™, Weight=0.019048oz
U24: library part CMP-00196-112300131-1, "S25FL128SAGNFM003 NOR Flash 128Mbit 32M X 4Bit/64M X 2Bit/128M X 1Bit Serial-SPI 8-Pin WSON T/R", Ambient Temperature Range High=125°C, Frequency=133MHz, Max Supply Voltage=3.6V, Min Operating Temperature=-40°C, Min Supply Voltage=1.65V, Access Time=8ns, Height=800µm, Interface=SPI, Max Operating Temperature=125°C, Memory Size=16MB, Memory Type="FLASH, NOR", NexarPartId=112300131
U25 U26: library part CMP-019-00061-1, "DDR3L Dram, 256MX16, Cmos, PBGA96", Case/Package=TFBGA, Max Supply Voltage=1.45V, Min Supply Voltage=1.283V
U27: library part CMP-019-00062-1, "5-Channel Integrated Power Solution with Quad Buck Regulators and 200 mA LDO Regulator", Case/Package="LFCSP EP", Max Operating Temperature=125°C, Max Supply Voltage=15V, Min Operating Temperature=-40°C, Min Supply Voltage=4.5V, Nominal Supply Current=4.8mA, Output Current=200mA, Output Voltage=3.305V, Mounting Technology="Surface Mount", Pins=48
U28: library part CMP-019-00063-1, "2.7-V to 18-V, 42mΩ, 0.6-5.2A eFuse with reverse current blocking and DevSleep support 20-WQFN -40 to 85", Max Operating Temperature=85°C, Max Supply Voltage=18V, Min Operating Temperature=-40°C, Min Supply Voltage=2.7V, Nominal Supply Current=2.02mA, Output Current=5.3A, Mounting Technology="Surface Mount", Pins=20
U29: library part CMP-0784-00537-1, "Precision, Micropower LDO Voltage Reference in TSOT, 1.25 V Output, 2.7 to 18 V Supply, Industrial, 6-pin SOT23 (UJ-6), Reel", Manufacturer="Analog Devices", Operating Temp Range="-40 to 125 degC", Code_JEDEC=MO-193-AA, ComponentLink1Description="Manufacturer URL", ComponentLink1URL=http://www.analog.com/en/index.html, ComponentLink2Description=Datasheet, ComponentLink2URL=http://www.analog.com/static/imported-files/data_sheets/ADR121_125_127.pdf, ComponentLink3Description="Package Specification", ComponentLink3URL=http://www.analog.com/static/imported-files/packages/PKG_PDF/TSOT(UJ)/UJ_6.pdf, ComponentLink4Description="URL Link1", ComponentLink4URL="Product URL:http://www.analog.com/en/special-linear-functions/voltage-references/adr127/products/product.html", DatasheetVersion="Rev. B", Max V Supply (V)=18, Min V Supply (V)=2.7, Mounting Technology="Surface Mount", PackageDescription="6-Pin Thin Small Outline Transistor Package, Body 2.9 x 1.6 mm, Pitch 0.95 mm", PackageReference=UJ-6, PackageVersion=Dec-04, Packing=Reel, PartNumber=ADR127BUJZ-REEL7, Ref Out TC (ppm/C)=3, Vout=1.25V
Y1: library part ABMM-25.000MHZ-B2-T, "Crystal or Oscillator", Manufacturer_Name=ABRACON, Mouser Part Number=815-ABMM-25-B2-T, Arrow Part Number=ABMM-25.000MHZ-B2-T, Arrow Price/Stock=https://www.arrow.com/en/products/abmm-25.000mhz-b2-t/abracon?utm_currency=USD&region=nac, Datasheet Link=https://abracon.com/Resonators/ABMM.pdf, Height=1.2mm, Manufacturer_Part_Number=ABMM-25.000MHZ-B2-T, Mouser Price/Stock=https://www.mouser.co.uk/ProductDetail/ABRACON/ABMM-25.000MHZ-B2-T?qs=aMAwYrhw3fjtGmDmGUYkhw%3D%3D
Y2: library part CMP-27762-015475-1, "Crystal 12.288MHz ±20ppm (Tol) ±30ppm (Stability) 18pF FUND 80Ω 4-Pin SMD T/R", Case/Package=SMD/SMT, ESR (Equivalent Series Resistance)=80R, Frequency=12.288MHz, Frequency Stability=30ppm, Frequency Tolerance=20ppm, Load Capacitance=18pF, Max Operating Temperature=85°C, Min Operating Temperature=-40°C, Operating Frequency="12.288 MHz", Package Quantity=1000, Depth=2.5mm, Height=0.039inch, Lead Free="Lead Free", Length=3.2mm, Mount="Surface Mount", Number of Pins=4, Packaging="Tape and Reel", REACH SVHC=Yes, Series=ABM8G, Series Resistance=80R, Termination=SMD/SMT, Tolerance=20ppm, Width=0.098inch
Y3: library part CMP-06255-000108-1, "MEMS OSC XO 212.5000MHZ LVDS SMD", Case/Package=SMD/SMT, Frequency=212.5MHz, Frequency Stability=10ppm, Max Operating Temperature=105°C, Max Supply Current=32mA, Min Operating Temperature=-40°C, Ratings=AEC-Q100, Height=0.035inch, Length=0.098inch, Mount="Surface Mount", Packaging="Tape and Reel", Series=DSC1123, Width=0.079inch

## Via types
v1: diameter 0.4, hole 0.2, Top Layer to Bottom Layer, 249 vias
v2: diameter 0.4/0.2/0.2/0.2/0.2/0.2/0.2/0.2 (per signal layer), hole 0.2, Top Layer to Bottom Layer, 148 vias
v3: diameter 0.4/0.2/0.4/0.2/0.2/0.2/0.2/0.2 (per signal layer), hole 0.2, Top Layer to Bottom Layer, 136 vias
v4: diameter 0.4/0.2/0.2/0.4/0.2/0.2/0.2/0.2 (per signal layer), hole 0.2, Top Layer to Bottom Layer, 98 vias
v5: diameter 0.4/0.2/0.2/0.2/0.2/0.4/0.2/0.2 (per signal layer), hole 0.2, Top Layer to Bottom Layer, 68 vias
v6: diameter 0.4/0.4/0.2/0.2/0.4/0.2/0.4/0.4 (per signal layer), hole 0.2, Top Layer to Bottom Layer, 62 vias
v7: diameter 0.5, hole 0.2, Top Layer to Bottom Layer, 52 vias
v8: diameter 0.4/0.2/0.2/0.2/0.2/0.2/0.2/0.4 (per signal layer), hole 0.2, Top Layer to Bottom Layer, 31 vias
v9: diameter 0.5, hole 0.3, Top Layer to Bottom Layer, 25 vias
v10: diameter 0.4/0.4/0.2/0.2/0.4/0.4/0.4/0.4 (per signal layer), hole 0.2, Top Layer to Bottom Layer, 20 vias
v11: diameter 0.2/0.2/0.2/0.4/0.2/0.2/0.2/0.4 (per signal layer), hole 0.2, Top Layer to Bottom Layer, 15 vias
v12: diameter 0.2/0.2/0.2/0.2/0.2/0.4/0.2/0.4 (per signal layer), hole 0.2, Top Layer to Bottom Layer, 11 vias
v13: diameter 0.4/0.4/0.4/0.4/0.4/0.4/0.4/0.4 (per signal layer), hole 0.2, Top Layer to Bottom Layer, 5 vias
v14: diameter 0.4/0.2/0.2/0.2/0.2/0.4/0.2/0.4 (per signal layer), hole 0.2, Top Layer to Bottom Layer, 2 vias
v15: diameter 0.2/0.4/0.4/0.4/0.4/0.4/0.4/0.4 (per signal layer), hole 0.2, Top Layer to Bottom Layer, 2 vias

## Nets (pads, with @x,y where several pads share a name; then routed paths per layer and width w, separated by ;. In a path a pad name is that pad's centre, name@x,y a point inside that pad or via, vN(x,y) a via of type N, cw(c..) or ccw(c..) an arc to the next point about the centre after c; other vN are vias at no path point)
/FLT: R302.1 U28.20 | length 2
  Bottom Layer w0.1: U28.20@137.465,167.284 137.465,168.046 137.846,168.427 R302.1@137.846,169.12
AC_BCLK: 1.H16 R123.1 | length 18.2
  Top Layer w0.05: 1.H16@143.942,106.718 v4(144.342,106.318)
  Top Layer w0.1: R123.1@139.845,120.117 140.296,120.567 140.506,120.567 v1(140.564,120.625)
  Layer 4 w0.1: 138.1,119.761 138.1,118.723 141.253,115.57 141.986,115.57 144.642,112.914 144.642,106.996 144.342,106.696 v4@144.342,106.325
AC_MCLK: 1.J14 R128.1 | length 21.7
  Top Layer w0.05: v4(144.342,105.518) 1.J14@144.742,105.118
  Top Layer w0.1: R128.1@132.073,117.119 132.076,117.119 132.965,116.23 v1(132.969,116.23)
  Layer 4 w0.1: v1(132.969,116.23) 135.255,116.23 136.195,115.291 138.455,115.291 138.684,115.062 141.732,115.062 143.853,112.941 143.853,106.566 143.935,106.484 143.935,105.918 v4@144.342,105.511
AC_MUTEN: 1.G14 R130.1 U15.25 | length 39.6
  Top Layer w0.05: v4(142.742,105.518) 1.G14@143.142,105.118
  Top Layer w0.1: v1(127.889,123.698) 128.27,124.079 130.81,124.079 131.293,123.596 U15.25@134.129,123.596
  Layer 4 w0.1: v1(127.889,123.698) 127.381,123.698 126.219,122.536 126.219,117.395 129.511,114.103 137.357,114.103 137.922,113.538 140.97,113.538 141.542,112.966 141.542,107.913 141.871,107.584 141.989,107.584 142.396,107.177 142.396,105.857 v4@142.742,105.511
AC_PBDAT: 1.J20 U15.8 | length 15.1
  Top Layer w0.05: 1.J20@144.742,109.918 v4(145.142,110.318)
  Top Layer w0.1: U15.8@138.75,122.096 138.75,121.597 139.341,121.006 139.441,121.006 139.486,121.05 139.719,121.05 v1(139.776,121.107)
  Layer 4 w0.131: 138.481,119.761 138.481,118.881 141.411,115.951 142.367,115.951 145.142,113.176 145.142,110.325 v4@145.135,110.318
AC_PBLRC: 1.J15 U15.9 | length 20.2
  Top Layer w0.05: 1.J15@144.742,105.918 v4(145.142,106.318)
  Top Layer w0.1: U15.9@138.75,122.596 139.113,122.596 139.173,122.537 139.198,122.537 140.008,121.727 140.117,121.727 140.355,121.488 v1(140.741,121.488)
  Layer 4 w0.1: 138.862,119.761 138.862,119.039 141.569,116.332 142.748,116.332 145.669,113.411 145.669,110.109 145.542,109.982 145.542,107.1 145.135,106.694 v4@145.135,106.318
AC_RECDAT: 1.M14 U15.10 | length 21.7
  Top Layer w0.05: v2(146.742,105.518) 1.M14@147.142,105.118
  Top Layer w0.1: U15.10@138.75,123.096 139.47,123.096 140.57,121.996 v1(141.199,121.996)
  Layer 4 w0.1: 139.243,119.761 139.243,119.197 141.727,116.713 143.256,116.713 146.243,113.726 146.243,106.01 v2@146.742,105.511
AC_RECLRC: 1.M15 U15.11 | length 20.7
  Top Layer w0.05: 1.M15@147.142,105.918 v4(147.542,105.518)
  Top Layer w0.1: U15.11@138.75,123.596 139.368,123.596 139.504,123.461 140.021,123.461 141.003,122.479 v1(141.199,122.479)
  Layer 4 w0.1: 140.945,118.99 140.945,118.034 141.884,117.094 143.637,117.094 147.042,113.689 147.042,106.021 v4@147.539,105.525
AC_SCL: 1.G15 R132.2 U15.28 | length 35.7
  Top Layer w0.05: 1.G15@143.142,105.918 v4(143.542,106.318)
  Top Layer w0.1: v1(127.889,121.539) 129.54,121.539 130.302,122.301 132.944,122.301 133.148,122.096 U15.28@134.129,122.096
  Layer 4 w0.1: v1(127.889,121.539) 127.889,120.904 127.635,120.65 127.635,117.119 129.845,114.909 138.075,114.909 138.392,114.592 141.44,114.592 143.078,112.954 143.078,107.162 143.535,106.705 v4@143.535,106.318
AC_SDA: 1.H15 R133.2 U15.27 | length 38
  Top Layer w0.05: v4(143.542,105.518) 1.H15@143.942,105.918
  Top Layer w0.1: v1(127.889,122.682) 128.143,122.936 133.147,122.936 133.486,122.596 U15.27@134.129,122.596
  Layer 4 w0.1: v1(127.889,122.682) 126.873,121.666 126.873,117.328 129.683,114.518 137.704,114.518 138.303,113.919 141.351,113.919 142.242,113.028 142.242,108.594 142.24,108.592 142.24,108.002 142.748,107.494 142.748,106.934 143.035,106.647 143.035,106.124 143.447,105.712 143.447,105.7 143.549,105.599 v4@143.549,105.518
ANA3V3: C51.2 C52.2 FB3.2 FB4.2 FB5.2 R119.2 U16.5
BST1: C208.1 U27.32 | length 1.9
  Bottom Layer w0.1: U27.32@169.127,102.158 169.127,104.019 C208.1@169.172,104.064
BST2: C215.2 U27.28 | length 1.9
  Bottom Layer w0.1: C215.2@167.074,104.064 167.127,104.011 U27.28@167.127,102.158
BST3: C218.1 U27.1
BST4: C221.1 U27.12 | length 1.7
  Bottom Layer w0.1: C221.1@164.981,93.904 164.981,93.979 165.627,94.625 U27.12@165.627,95.302
BTN0: 1.R19 R63.1 | length 98.5
  Top Layer w0.05: 1.R19@149.542,109.118 v3(149.942,109.518)
  Top Layer w0.1: R63.1@205.301,81.153 v1(206.248,81.153)
  Layer 4 w0.1: v1(148.844,122.555) 152.527,118.872 154.178,118.872 154.83,118.22 177.468,118.22 193.785,101.903 193.785,101.871 193.802,101.854 193.802,95.666 196.943,92.525 196.943,83.554 198.709,81.788 205.613,81.788 v1(206.248,81.153)
  Layer 3 w0.1: v1(148.844,122.555) 148.844,120.372 149.935,119.281 v3@149.935,109.518
BTN1: 1.J16 R59.1 | length 97.9
  Top Layer w0.05: 1.J16@144.742,106.718 v3(145.142,107.118)
  Top Layer w0.1: R59.1@198.189,81.153 v1(199.009,81.153)
  Layer 4 w0.1: v1(141.707,118.11) 142.215,118.618 154.051,118.618 154.686,117.983 177.37,117.983 193.548,101.805 193.548,95.585 196.706,92.427 196.706,83.456 v1(199.009,81.153)
  Layer 3 w0.1: v1(141.707,118.11) 141.935,118.339 143.231,118.339 143.815,117.754 143.815,114.432 144.018,114.229 144.018,109.57 143.654,109.206 143.606,109.206 143.242,108.842 143.242,108.594 143.518,108.318 143.566,108.318 143.955,107.929 143.955,107.874 144.344,107.485 144.769,107.485 v3@145.135,107.118
BTN2: 1.G19 R57.1 | length 92.8
  Top Layer w0.05: 1.G19@143.142,109.118 v3(143.542,109.518)
  Top Layer w0.1: R57.1@190.061,81.153 v1(191.008,81.153)
  Layer 4 w0.1: v1(142.265,117.78) 142.867,118.381 153.907,118.381 154.559,117.729 177.289,117.729 193.311,101.707 193.311,95.487 196.469,92.329 196.469,86.614 v1(191.008,81.153)
  Layer 3 w0.1: v1(142.265,117.78) 142.265,115.646 143.781,114.131 143.781,109.757 v3(143.542,109.518) v3@143.535,109.518
BTN3: 1.N17 R55.1 | length 82.4
  Top Layer w0.05: v3(147.542,107.918) 1.N17@147.942,107.518
  Top Layer w0.1: R55.1@182.187,81.153 v1(183.134,81.153)
  Layer 4 w0.1: v1(147.853,116.484) 148.387,115.951 176.708,115.951 186.3,106.359 186.3,95.386 189.23,92.456 189.23,90.484 183.134,84.388 v1(183.134,81.153)
  Layer 3 w0.1: v3@147.542,107.911 147.542,109.087 147.066,109.563 147.066,116.103 147.447,116.484 v1(147.853,116.484)
CAM_CLK: 1.V16 J1.12 | length 43.7
  Top Layer w0.05: v3(151.542,107.118) 1.V16@151.942,106.718
  Top Layer w0.131: v1(152.019,122.555) 152.05,122.524 155.798,122.524 158.496,125.222 158.496,126.619 159.608,127.731 161.259,127.731 162.471,128.943 J1.12@162.471,135.516 J1.12@162.471,139.266
  Layer 3 w0.124: v3(151.542,107.118) 151.97,107.546 151.97,108.025 152.218,108.274 152.429,108.274 152.743,108.588 152.743,110.452 155.829,113.538 155.829,118.745 v1(152.019,122.555)
CAM_GPIO: 1.W16 J1.11 | length 42.4
  Top Layer w0.05: v3(152.342,107.118) 1.W16@152.742,106.718